# Altium PCB PCB1.PcbDoc (part 2 of 2)
Units mm, origin at the board's own origin, x right, y up, seen from the top; angles counter-clockwise.
Board outline 60 x 60 mm, 2 copper layers (Top Layer, Bottom Layer); 59 components, 49 nets, 265 pads, 0 vias.
Unrouted connection lines stored in the file: 170.
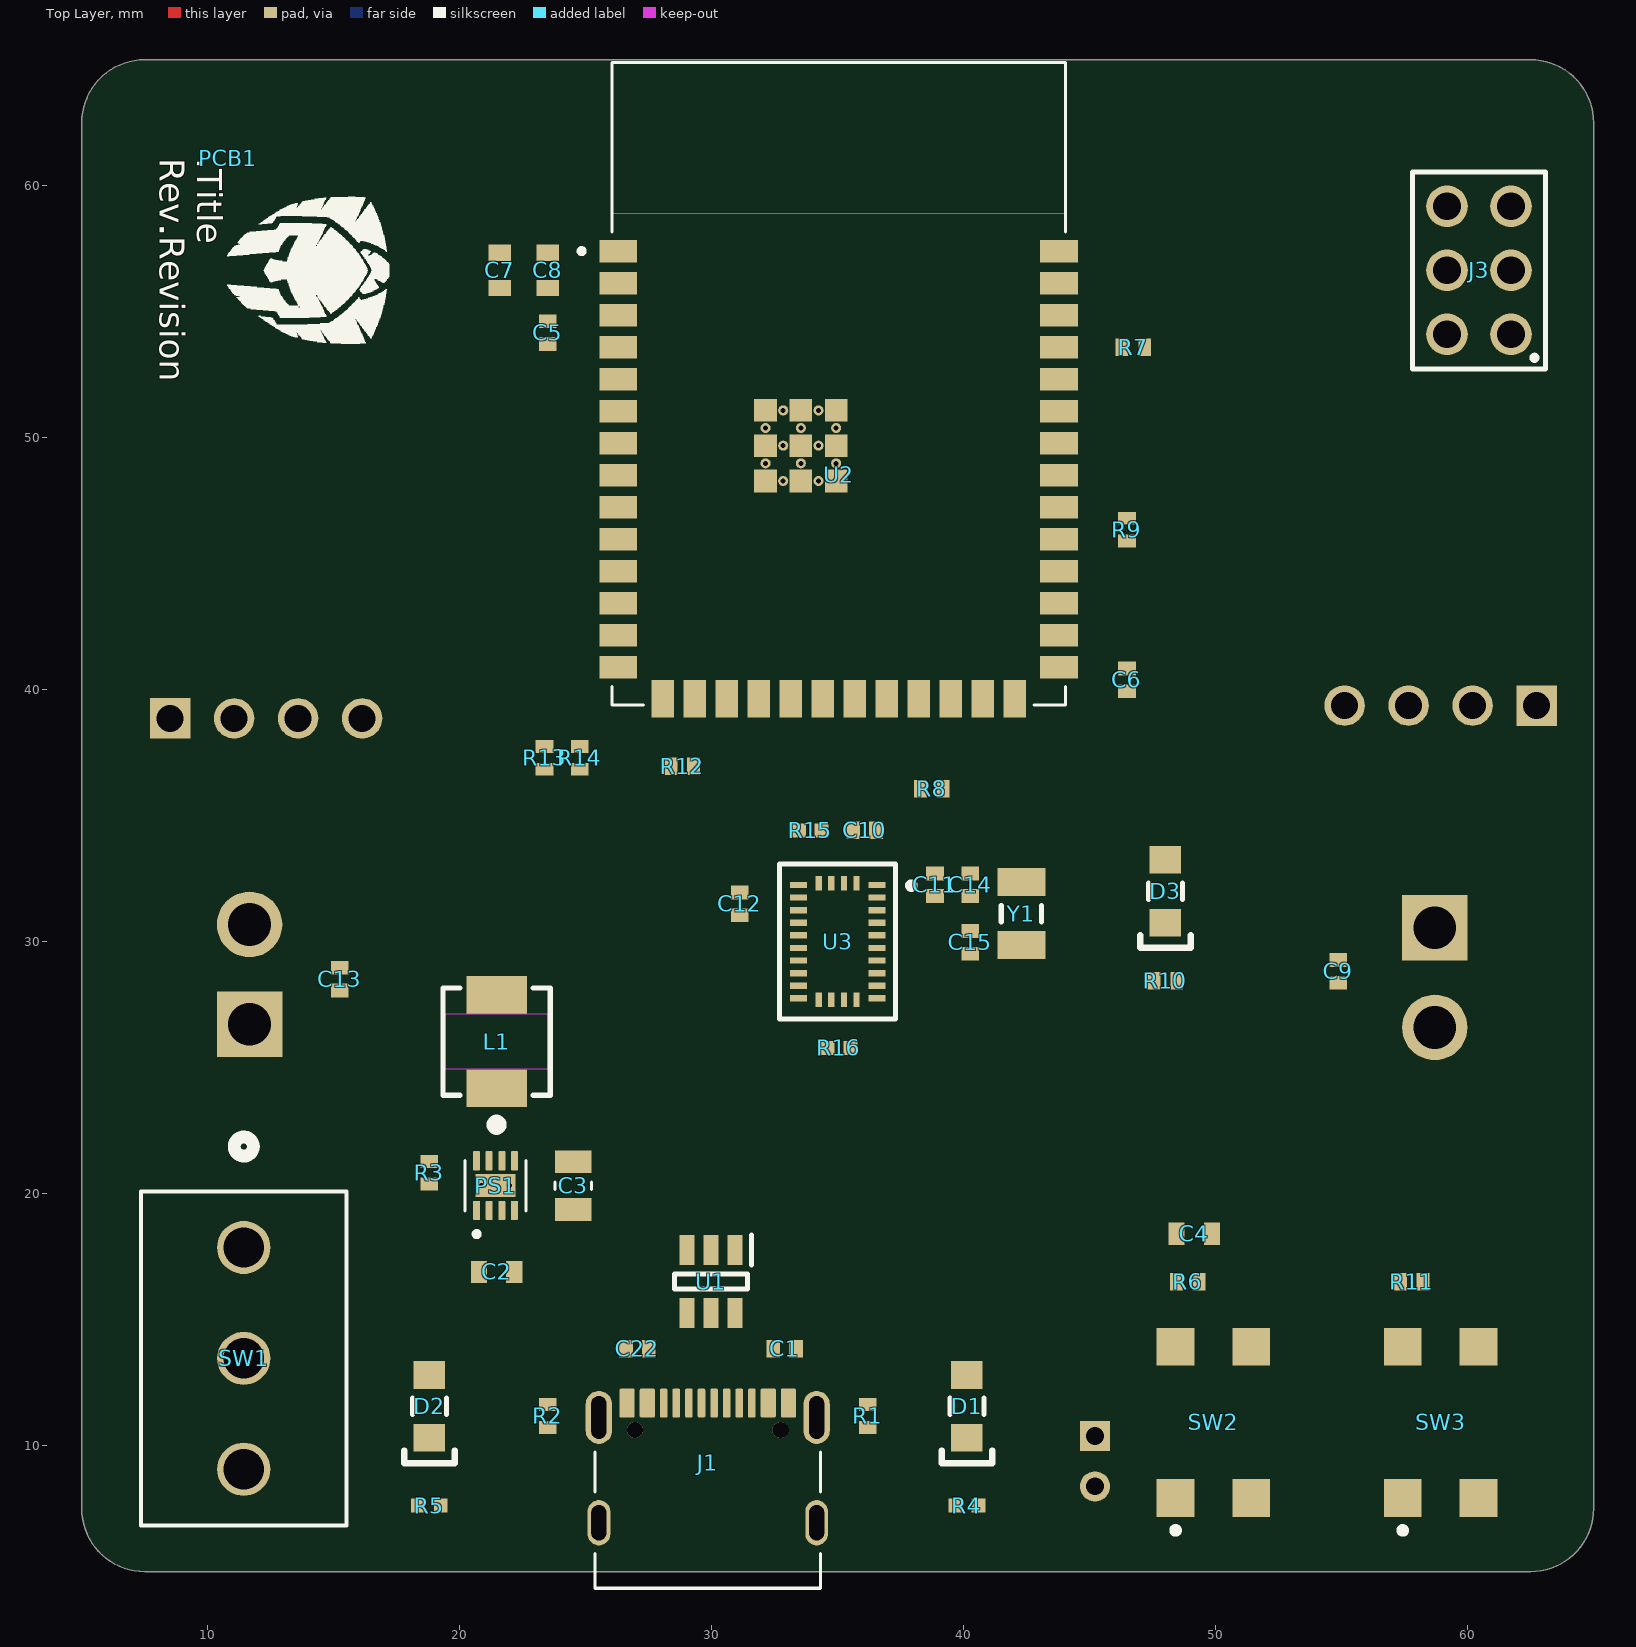
[diagram p0: Top Layer view]

## Part data (continued)
R1 R2: library part "R5K1 1% 0402", "5K1 1% 0402 1/16W", Manufacturer="Stackpole Electronics Inc", Manufacturer Part Number=RMCF0402FT5K10, Package=0402, Power=1/16W, Supplier Part Number 1=RMCF0402FT5K10CT-ND, Tolerance=1%, Datasheet=https://www.seielect.com/catalog/sei-rmcf_rmcp.pdf, Internal Code=0-ECRES5K1%01P0402-SI, Supplier 1=DigiKey, Supplier Link 1=https://www.digikey.com/product-detail/en/stackpole-electronics-inc/RMCF0402FT5K10/RMCF0402FT5K10CT-ND/2417741, Type=Resistor
R3: library part "R100K 1% 0402", "100K 1% 0402 1/16W", Manufacturer=Yageo, Package=0402, Power=1/16W, Supplier Part Number 1=311-100KLRCT-ND, Tolerance=1%, Manufacturer Part Number=RC0402FR-07100KL, Supplier 1=Digikey, Supplier Link 1=https://www.digikey.com/product-detail/en/yageo/RC0402FR-07100KL/311-100KLRCT-ND/729473, Type=Resistor
R4 R5 R15 R16: library part "R10K 1% 0402", "Res Thick Film 0402 10K Ohm 1% 0.063W(1/16W) ±100ppm/C Pad SMD T/R", Case Code (Imperial)=0402, Manufacturer="Yageo Group", Max Operating Temperature=155°C, Min Operating Temperature=-55°C, Power Dissipation=62.5mW, Power Rating=63mW, Supplier Part Number=311-10.0KLRDKR-ND, Temperature Coefficient=100ppm/°C, Tolerance=1%, Voltage Rating=50V, Case Code (Metric)=0402, Case/Package=0402, Category="Chip SMD Resistors", China RoHS=Non-Compliant, ComponentLink1Description=https://datasheet.octopart.com:443/RC0402FR-0710KL-Yageo-datasheet-175887523.pdf?src-supplier=Newark, ComponentLink1URL=https://datasheet.octopart.com:443/RC0402FR-0710KL-Yageo-datasheet-175887523.pdf?src-supplier=Newark, ComponentLink2Description=https://datasheet.octopart.com:443/RC0402FR-0710KL-Yageo-Group-datasheet-190305687.pdf?src-supplier=Newark, ComponentLink2URL=https://datasheet.octopart.com:443/RC0402FR-0710KL-Yageo-Group-datasheet-190305687.pdf?src-supplier=Newark, ComponentLink3Description=https://datasheet.octopart.com:443/RC0402FR-0710KL-Yageo-datasheet-12531192.pdf?src-supplier=Newark, ComponentLink3URL=https://datasheet.octopart.com:443/RC0402FR-0710KL-Yageo-datasheet-12531192.pdf?src-supplier=Newark, ComponentLink4Description=https://datasheet.octopart.com:443/RC0402FR-0710KL-Yageo-datasheet-8324527.pdf?src-supplier=Newark, ComponentLink4URL=https://datasheet.octopart.com:443/RC0402FR-0710KL-Yageo-datasheet-8324527.pdf?src-supplier=Newark, ComponentLink5Description=https://datasheet.octopart.com:443/RC0402FR-0710KL-Yageo-datasheet-10408619.pdf?src-supplier=element14+APAC, ComponentLink5URL=https://datasheet.octopart.com:443/RC0402FR-0710KL-Yageo-datasheet-10408619.pdf?src-supplier=element14+APAC, ComponentLink6Description=https://datasheet.octopart.com:443/RC0402FR-0710KL-Yageo-datasheet-62067350.pdf?src-supplier=element14+APAC, ComponentLink6URL=https://datasheet.octopart.com:443/RC0402FR-0710KL-Yageo-datasheet-62067350.pdf?src-supplier=element14+APAC, ComponentLink7Description=https://datasheet.octopart.com:443/RC0402FR-0710KL-Yageo-datasheet-21426659.pdf?src-supplier=element14+APAC, ComponentLink7URL=https://datasheet.octopart.com:443/RC0402FR-0710KL-Yageo-datasheet-21426659.pdf?src-supplier=element14+APAC, ComponentLink8Description=https://datasheet.octopart.com:443/RC0402FR-0710KL-Yageo-datasheet-164759695.pdf?src-supplier=Upverter, ComponentLink8URL=https://datasheet.octopart.com:443/RC0402FR-0710KL-Yageo-datasheet-164759695.pdf?src-supplier=Upverter, ComponentLink9Description=https://datasheet.octopart.com:443/RC0402FR-0710KL-Yageo-datasheet-103092701.pdf?src-supplier=Upverter, ComponentLink9URL=https://datasheet.octopart.com:443/RC0402FR-0710KL-Yageo-datasheet-103092701.pdf?src-supplier=Upverter, ComponentLink10Description=https://sigma.octopart.com:443/138820526/technical_drawing/Yageo-RC0402FR-0710KL.pdf?src-supplier=Upverter, ComponentLink10URL=https://sigma.octopart.com:443/138820526/technical_drawing/Yageo-RC0402FR-0710KL.pdf?src-supplier=Upverter, ComponentLink11Description=https://datasheet.octopart.com:443/RC0402FR-0710KL-Yageo-datasheet-98239111.pdf?src-supplier=Upverter, ComponentLink11URL=https://datasheet.octopart.com:443/RC0402FR-0710KL-Yageo-datasheet-98239111.pdf?src-supplier=Upverter, ComponentLink12Description=https://datasheet.octopart.com:443/RC0402FR-0710KL-Yageo-datasheet-68298067.pdf?src-supplier=Upverter, ComponentLink12URL=https://datasheet.octopart.com:443/RC0402FR-0710KL-Yageo-datasheet-68298067.pdf?src-supplier=Upverter, ComponentLink13Description=https://datasheet.octopart.com:443/RC0402FR-0710KL-Yageo-datasheet-68297981.pdf?src-supplier=Upverter, ComponentLink13URL=https://datasheet.octopart.com:443/RC0402FR-0710KL-Yageo-datasheet-68297981.pdf?src-supplier=Upverter, ComponentLink14Description=https://datasheet.octopart.com:443/RC0402FR-0710KL-Yageo-datasheet-141435361.pdf?src-supplier=Upverter, ComponentLink14URL=https://datasheet.octopart.com:443/RC0402FR-0710KL-Yageo-datasheet-141435361.pdf?src-supplier=Upverter, ComponentLink15Description=https://datasheet.octopart.com:443/RC0402FR-0710KL-Yageo-datasheet-12509768.pdf?src-supplier=Upverter, ComponentLink15URL=https://datasheet.octopart.com:443/RC0402FR-0710KL-Yageo-datasheet-12509768.pdf?src-supplier=Upverter, ComponentLink16Description=https://datasheet.octopart.com:443/RC0402FR-0710KL-Yageo-datasheet-8329306.pdf?src-supplier=element14, ComponentLink16URL=https://datasheet.octopart.com:443/RC0402FR-0710KL-Yageo-datasheet-8329306.pdf?src-supplier=element14, ComponentLink17Description=https://datasheet.octopart.com:443/RC0402FR-0710KL-Yageo-datasheet-505231.pdf?src-supplier=element14, ComponentLink17URL=https://datasheet.octopart.com:443/RC0402FR-0710KL-Yageo-datasheet-505231.pdf?src-supplier=element14, ComponentLink18Description=https://datasheet.octopart.com:443/RC0402FR-0710KL-Yageo-datasheet-175423674.pdf?src-supplier=SOS+electronic, ComponentLink18URL=https://datasheet.octopart.com:443/RC0402FR-0710KL-Yageo-datasheet-175423674.pdf?src-supplier=SOS+electronic, ComponentLink19Description=https://datasheet.octopart.com:443/RC0402FR-0710KL-Yageo-datasheet-137700087.pdf?src-supplier=Future+Electronics, ComponentLink19URL=https://datasheet.octopart.com:443/RC0402FR-0710KL-Yageo-datasheet-137700087.pdf?src-supplier=Future+Electronics, ComponentLink20Description=https://datasheet.octopart.com:443/RC0402FR-0710KL-Yageo-datasheet-8324255.pdf?src-supplier=Future+Electronics, ComponentLink20URL=https://datasheet.octopart.com:443/RC0402FR-0710KL-Yageo-datasheet-8324255.pdf?src-supplier=Future+Electronics, ComponentLink21Description=https://datasheet.octopart.com:443/RC0402FR-0710KL-Yageo-datasheet-79472498.pdf?src-supplier=Megastar, ComponentLink21URL=https://datasheet.octopart.com:443/RC0402FR-0710KL-Yageo-datasheet-79472498.pdf?src-supplier=Megastar, ComponentLink22Description=https://datasheet.octopart.com/RC0402FR-0710KL-Yageo-datasheet-73766026.pdf, ComponentLink22URL=https://datasheet.octopart.com/RC0402FR-0710KL-Yageo-datasheet-73766026.pdf, ComponentLink23Description=http://sigma.octopart.com:80/conflict_mineral_statement/Yageo-company-3.pdf?src-supplier=Compliance+Statements, ComponentLink23URL=http://sigma.octopart.com:80/conflict_mineral_statement/Yageo-company-3.pdf?src-supplier=Compliance+Statements, ComponentLink24Description=http://sigma.octopart.com:80/rohs_statement/Yageo-company-2.pdf?src-supplier=Compliance+Statements, ComponentLink24URL=http://sigma.octopart.com:80/rohs_statement/Yageo-company-2.pdf?src-supplier=Compliance+Statements, Composition="Thick Film", Depth=500µm, Height=350µm, Lead Free="Lead Free", Lead Pitch=200µm, Length=1mm, Lifecycle Status=Production, Manufacturer Part Number=RC0402FR-0710KL, Military Standard=Not, Mounting Technology="Surface Mount", Number of Terminals=2, Number of Terminations=2, Packaging="Tape & Reel", Pins=2, Pricing="1=0.1, 10=0.010, 25=0.0072, 50=0.004 (USD)", REACH SVHC=Yes, RoHS=Compliant, Schedule B="8533210045, 8533210045|8533210045|8533210045|8533210045|8533210045|8533210045|8533210045|8533210045|8533210045|8533210045|8533210045|8533210045|8533210045|8533210045, 8533210045|8533210045|8533210045|8533210045|8533210045|8533210045|8533210045|8533210045|8533210045|8533210045|8533210045|8533210045|8533210045|8533210045|8533210045, 8533210045|8533210045|8533210045|8533210045|8533210045|8533210045|8533210045|8533210045|8533210045|8533210045|8533210045|8533210045|8533210045|8533210045|8533210045|8533210045", Stock=4103358, Supplier=DigiKey, Supplier 1=DigiKey, Supplier 2=DigiKey, Supplier 3=Mouser, Supplier Part Number 1=311-10.0KLRDKR-ND, Supplier Part Number 2=311-10.0KLRCT-ND, Supplier Part Number 3=603-RC0402FR-0710KL, Termination=SMD/SMT, Voltage Rating (DC)=50V, Width=500µm, Working Voltage=50V
R6 R10: library part "R10K 1% 0402", "10K 1% 0402 1/16W", Manufacturer=Yageo, Package=0402, Power=1/16W, Supplier Part Number 1=311-10.0KLRCT-ND, Tolerance=1%, Datasheet=http://www.yageo.com/documents/recent/PYu-RC_Group_51_RoHS_L_10.pdf, Internal Code=0-ECRES10K%01P0402-YG, Manufacturer Part Number=RC0402FR-0710KL, Supplier 1=DigiKey, Supplier Link 1=https://www.digikey.com/product-detail/en/yageo/RC0402FR-0710KL/311-10.0KLRCT-ND/729470, Type=Resistor
R7: library part "R470 1% 0402", "470R 1% 0402 1/16W", Case/Package=0402, Manufacturer=Yageo, Manufacturer Part Number=RC0402FR-07470RL, Max Operating Temperature=155°C, Min Operating Temperature=-55°C, Package Height=0.35mm, Package Length=1mm, Package Shape=Rectangular, Package Width=0.5mm, Power=62.5mW, Rated Temperature=70°C, Resistor Type="FIXED RESISTOR", Supplier Part Number=311-470LRCT-ND, Temperature Coefficient (ppm/Cel)=100, Tolerance=1%, Working Voltage=50V, Additional Feature="LASER TRIMMABLE", Category="Chip SMD Resistors", ComponentLink1Description=https://datasheet.ciiva.com:443/pdfs/VipMasterIC/IC/YAGO/YAGO-S-A0008145938/YAGO-S-A0008145938-1.pdf?src-supplier=IHS+Markit, ComponentLink1URL=https://datasheet.ciiva.com:443/pdfs/VipMasterIC/IC/YAGO/YAGO-S-A0008145938/YAGO-S-A0008145938-1.pdf?src-supplier=IHS+Markit, ComponentLink2Description=https://datasheet.ciiva.com/2453/pyu-r-int-thick-7-2453376.pdf?src-supplier=Digikey, ComponentLink2URL=https://datasheet.ciiva.com/2453/pyu-r-int-thick-7-2453376.pdf?src-supplier=Digikey, ComponentLink3Description=https://datasheet.ciiva.com/2453/pyu-r-int-thick-7-2453377.pdf?src-supplier=Digikey, ComponentLink3URL=https://datasheet.ciiva.com/2453/pyu-r-int-thick-7-2453377.pdf?src-supplier=Digikey, ComponentLink4Description=https://datasheet.ciiva.com/2453/pyu-r-int-thick-7-2453378.pdf?src-supplier=Digikey, ComponentLink4URL=https://datasheet.ciiva.com/2453/pyu-r-int-thick-7-2453378.pdf?src-supplier=Digikey, ComponentLink5Description=https://datasheet.ciiva.com/15189/getdatasheetpartid-330246-15189463.pdf?src-supplier=Verical, ComponentLink5URL=https://datasheet.ciiva.com/15189/getdatasheetpartid-330246-15189463.pdf?src-supplier=Verical, ComponentLink6Description=https://datasheet.ciiva.com/7850/1018594-7850014.pdf?src-supplier=Element14, ComponentLink6URL=https://datasheet.ciiva.com/7850/1018594-7850014.pdf?src-supplier=Element14, ComponentLink7Description=https://datasheet.ciiva.com/7850/1018594-7850015.pdf?src-supplier=Element14, ComponentLink7URL=https://datasheet.ciiva.com/7850/1018594-7850015.pdf?src-supplier=Element14, ComponentLink8Description=https://datasheet.ciiva.com/46412/1018594-46412838.pdf?src-supplier=Element14, ComponentLink8URL=https://datasheet.ciiva.com/46412/1018594-46412838.pdf?src-supplier=Element14, Construction=Chip, JESD-609 Code=e3, Mounting Technology="Surface Mount", Packaging="Tape and Reel", Pins=2, Pricing="1=0.1, 10=0.008, 25=0.004, 50=0.003 (USD)", Reach SVHC Compliant=Yes, RoHS=Yes, RoHS Compliant=Yes, Stock=1075453, Supplier=Digikey, Technology="METAL GLAZE/THICK FILM", Terminal Finish=Nickel, Termination=Wraparound
R8 R9: library part "R2K2 1% 0402", "2K2 1% 0402 1/16W", Manufacturer=Yageo, Package=0402, Power=1/16W, Supplier Part Number 1=YAG1260CT-ND, Tolerance=1%, Datasheet=https://www.yageo.com/upload/media/product/productsearch/datasheet/rchip/PYu-RC_51_RoHS_P_1.pdf, Manufacturer Part Number=RC0402FR-072K2P, Supplier 1=DigiKey, Supplier Link 1=https://www.digikey.fr/product-detail/en/yageo/RC0402FR-072K2P/YAG1260CT-ND/4935375, Type=Resistor
R11 R12: library part "R47K 1% 0402", "47K 1% 0402 1/16W", Manufacturer=Yageo, Package=0402, Power=1/16W, Supplier Part Number 1=603-RC0402FR-7D47KL, Tolerance=1%, Manufacturer Part Number=RC0402FR-7D47KL, Supplier 1=Mouser, Type=Resistor
R13 R14: library part "R33 1% 0402", "Res Thick Film 0402 33 Ohm 5% 0.063W(1/16W) ±100ppm/C Pad SMD T/R", Case Code (Imperial)=0402, Manufacturer="Yageo Group", Max Operating Temperature=155°C, Max Power Dissipation=63mW, Min Operating Temperature=-55°C, Power Rating=62.5mW, Supplier Part Number=311-33JRDKR-ND, Temperature Coefficient=100ppm/°C, Tolerance=5%, Voltage Rating=50V, Case/Package=0402, Category="Chip SMD Resistors", China RoHS=Non-Compliant, ComponentLink1Description=https://datasheet.octopart.com:443/RC0402JR-0733RL-Yageo-datasheet-175887523.pdf?src-supplier=Newark, ComponentLink1URL=https://datasheet.octopart.com:443/RC0402JR-0733RL-Yageo-datasheet-175887523.pdf?src-supplier=Newark, ComponentLink2Description=https://datasheet.octopart.com:443/RC0402JR-0733RL-Yageo-datasheet-10408619.pdf?src-supplier=Newark, ComponentLink2URL=https://datasheet.octopart.com:443/RC0402JR-0733RL-Yageo-datasheet-10408619.pdf?src-supplier=Newark, ComponentLink3Description=https://datasheet.octopart.com:443/RC0402JR-0733RL-Yageo-datasheet-8324527.pdf?src-supplier=Newark, ComponentLink3URL=https://datasheet.octopart.com:443/RC0402JR-0733RL-Yageo-datasheet-8324527.pdf?src-supplier=Newark, ComponentLink4Description=https://datasheet.octopart.com:443/RC0402JR-0733RL-Yageo-datasheet-141265859.pdf?src-supplier=Upverter, ComponentLink4URL=https://datasheet.octopart.com:443/RC0402JR-0733RL-Yageo-datasheet-141265859.pdf?src-supplier=Upverter, ComponentLink5Description=https://sigma.octopart.com:443/138820526/technical_drawing/Yageo-RC0402JR-0733RL.pdf?src-supplier=Upverter, ComponentLink5URL=https://sigma.octopart.com:443/138820526/technical_drawing/Yageo-RC0402JR-0733RL.pdf?src-supplier=Upverter, ComponentLink6Description=https://datasheet.octopart.com:443/RC0402JR-0733RL-Yageo-datasheet-62067350.pdf?src-supplier=element14+APAC, ComponentLink6URL=https://datasheet.octopart.com:443/RC0402JR-0733RL-Yageo-datasheet-62067350.pdf?src-supplier=element14+APAC, ComponentLink7Description=https://datasheet.octopart.com:443/RC0402JR-0733RL-Yageo-Group-datasheet-176638170.pdf?src-supplier=Future+Electronics, ComponentLink7URL=https://datasheet.octopart.com:443/RC0402JR-0733RL-Yageo-Group-datasheet-176638170.pdf?src-supplier=Future+Electronics, ComponentLink8Description=https://datasheet.octopart.com:443/RC0402JR-0733RL-Yageo-datasheet-164759695.pdf?src-supplier=Future+Electronics, ComponentLink8URL=https://datasheet.octopart.com:443/RC0402JR-0733RL-Yageo-datasheet-164759695.pdf?src-supplier=Future+Electronics, ComponentLink9Description=https://datasheet.octopart.com:443/RC0402JR-0733RL-Yageo-datasheet-127823281.pdf?src-supplier=Future+Electronics, ComponentLink9URL=https://datasheet.octopart.com:443/RC0402JR-0733RL-Yageo-datasheet-127823281.pdf?src-supplier=Future+Electronics, ComponentLink10Description=https://datasheet.octopart.com:443/RC0402JR-0733RL-Yageo-datasheet-137700087.pdf?src-supplier=Future+Electronics, ComponentLink10URL=https://datasheet.octopart.com:443/RC0402JR-0733RL-Yageo-datasheet-137700087.pdf?src-supplier=Future+Electronics, ComponentLink11Description=https://datasheet.octopart.com:443/RC0402JR-0733RL-Yageo-datasheet-103092701.pdf?src-supplier=Future+Electronics, ComponentLink11URL=https://datasheet.octopart.com:443/RC0402JR-0733RL-Yageo-datasheet-103092701.pdf?src-supplier=Future+Electronics, ComponentLink12Description=https://datasheet.octopart.com:443/RC0402JR-0733RL-Yageo-datasheet-98239111.pdf?src-supplier=Future+Electronics, ComponentLink12URL=https://datasheet.octopart.com:443/RC0402JR-0733RL-Yageo-datasheet-98239111.pdf?src-supplier=Future+Electronics, ComponentLink13Description=https://datasheet.octopart.com:443/RC0402JR-0733RL-Yageo-datasheet-77992522.pdf?src-supplier=Future+Electronics, ComponentLink13URL=https://datasheet.octopart.com:443/RC0402JR-0733RL-Yageo-datasheet-77992522.pdf?src-supplier=Future+Electronics, ComponentLink14Description=https://datasheet.octopart.com:443/RC0402JR-0733RL-Yageo-datasheet-67302840.pdf?src-supplier=Future+Electronics, ComponentLink14URL=https://datasheet.octopart.com:443/RC0402JR-0733RL-Yageo-datasheet-67302840.pdf?src-supplier=Future+Electronics, ComponentLink15Description=https://datasheet.octopart.com:443/RC0402JR-0733RL-Yageo-datasheet-12531192.pdf?src-supplier=Future+Electronics, ComponentLink15URL=https://datasheet.octopart.com:443/RC0402JR-0733RL-Yageo-datasheet-12531192.pdf?src-supplier=Future+Electronics, ComponentLink16Description=https://datasheet.octopart.com:443/RC0402JR-0733RL-Yageo-datasheet-505231.pdf?src-supplier=Future+Electronics, ComponentLink16URL=https://datasheet.octopart.com:443/RC0402JR-0733RL-Yageo-datasheet-505231.pdf?src-supplier=Future+Electronics, ComponentLink17Description=https://datasheet.octopart.com/RC0402JR-0733RL-Yageo-datasheet-73766026.pdf, ComponentLink17URL=https://datasheet.octopart.com/RC0402JR-0733RL-Yageo-datasheet-73766026.pdf, ComponentLink18Description=https://datasheet.octopart.com:443/RC0402JR-0733RL-Yageo-datasheet-8329306.pdf?src-supplier=element14, ComponentLink18URL=https://datasheet.octopart.com:443/RC0402JR-0733RL-Yageo-datasheet-8329306.pdf?src-supplier=element14, ComponentLink19Description=http://sigma.octopart.com:80/conflict_mineral_statement/Yageo-company-3.pdf?src-supplier=Compliance+Statements, ComponentLink19URL=http://sigma.octopart.com:80/conflict_mineral_statement/Yageo-company-3.pdf?src-supplier=Compliance+Statements, ComponentLink20Description=http://sigma.octopart.com:80/rohs_statement/Yageo-company-2.pdf?src-supplier=Compliance+Statements, ComponentLink20URL=http://sigma.octopart.com:80/rohs_statement/Yageo-company-2.pdf?src-supplier=Compliance+Statements, Composition="Thick Film", Country of Origin="Mainland China, Taiwan", Depth=500µm, Export Control Classification Number (ECCN) Code=EAR99, Features="Moisture Resistant", Harmonized Tariff Schedule (HTS) Code=8533.21.00.30, Height=350µm, Introduction Date=2008-07-18, Lead Free="Lead Free", Length=1mm, Lifecycle Status=Production, Manufacturer Part Number=RC0402JR-0733RL, Military Standard=Not, Mounting Technology="Surface Mount", Number of Terminals=2, Number of Terminations=2, Packaging="Cut Tape", Pins=2, Pricing="1=0,1, 10=0,019, 25=0,0136, 50=0,0108, 100=0,0087, 250=0,0066, 500=0,00542, 1000=0,00451, 5000=0,00309 (USD)", REACH SVHC=Yes, RoHS=Compliant, Schedule B="8533210045, 8533210045|8533210045, 8533210045|8533210045|8533210045, 8533210045|8533210045|8533210045|8533210045", Stock=4800627, Supplier=DigiKey, Supplier 1=DigiKey, Supplier 2=DigiKey, Supplier Part Number 1=311-33JRDKR-ND, Supplier Part Number 2=311-33JRCT-ND, Termination=SMD/SMT, Voltage Rating (AC)=50V, Voltage Rating (DC)=50V, Width=500µm, Working Voltage=50V
SW1: "Switch Slide ON ON SPDT Top Slide 6A 250VAC 30VDC 100000Cycles PC Pins Thru-Hole Bag", Contact Current Rating=6A, Current Rating=4A, Manufacturer="Nidec Copal", Manufacturer_Name="Nidec Copal Electronics", Max Operating Temperature=85°C, Min Operating Temperature=-30°C, Voltage Rating (AC)=125V, Voltage Rating (DC)=30V, Actuator Length=5mm, Category="Slide Switches", ComponentLink1Description=https://datasheet.octopart.com:443/8SS1012-Z-Nidec-Copal-datasheet-180925849.pdf?src-supplier=IHS, ComponentLink1URL=https://datasheet.octopart.com:443/8SS1012-Z-Nidec-Copal-datasheet-180925849.pdf?src-supplier=IHS, ComponentLink2Description=https://datasheet.octopart.com:443/8SS1012-Z-Nidec-datasheet-158724552.pdf?src-supplier=RS+(Formerly+Allied+Electronics), ComponentLink2URL=https://datasheet.octopart.com:443/8SS1012-Z-Nidec-datasheet-158724552.pdf?src-supplier=RS+(Formerly+Allied+Electronics), Contact Plating=Silver, Contact Style=Non-Shorting, Copyright="Copyright (C) 2025 Ultra Librarian. All rights reserved.", Electrical Life=30kcycles, Export Control Classification Number (ECCN) Code=EAR99, Harmonized Tariff Schedule (HTS) Code=8536.50.70.00, Introduction Date=2016-11-16, Lifecycle Status=Production, Manufacturer Part Number=8SS1012-Z, Manufacturer_Part_Number=8SS1012-Z, Mechanical Life=100kcycles, Mounting Technology="Through Hole", Orientation=Vertical, Pricing="2=1,567 (USD)", RefDes=RefDes, RoHS=Compliant, Stock=1202, Supplier="Arrow Electronics", Supplier Part Number=8SS1012-Z, Switch Function=On-On, Switch Travel=2.2mm, Termination="PC Pin", Throw Configuration=SPDT, Type="Slide Switches"
SW2 SW3: "Tactile Switch SPST 1.6N 4.5mm", Manufacturer 1=HanElectricity, Manufacturer Part Number 1=C22375350, Supplier 1=LCSC, Supplier Link 1=https://www.lcsc.com/product-detail/C22375350.html?spm=wm.fly.bg.5.xh&lcsc_vid=FlhaAlQAEVMNVwEHT1BfXwFWEwcLXgcEEldWBVUDFFcxVlNRQlBYUFNUR1VWUjsOAxUeFF5JWBYZEEoBGA4JCwFIFA4DSA%3D%3D, Supplier Part Number 1=C22375350, Supplier Unit Price 1=0.0056
U1: "TVS Diode Array Uni-Directional USBLC6-2SC6 17V", Manufacturer 1=STMicroelectronics, Supplier Part Number 1=511-USBLC6-2SC6, Datasheet=https://www.st.com/resource/en/datasheet/usblc6-2.pdf, Height=1.45mm, Manufacturer Part Number 1=USBLC6-2SC6, Supplier 1=Mouser, Supplier Link 1=https://br.mouser.com/ProductDetail/STMicroelectronics/USBLC6-2SC6?qs=po45yt2pPpu%2FhNIlwQdTlg%3D%3D&srsltid=AfmBOoqislOEDh1UBDOoi8KtJgWNZBCyfvAKcoWTZlt-wyjpMBhjDG33, Supplier Unit Price 1=0.36
U2: Package=None, Availability=Unavailable, MF="{'manufacturer': u'Espressif Systems'}", MP=ESP32-S3-WROOM-1-N4, Price=None
U3: "IMU ACCEL/GYRO/MAG I2C 32BIT", Manufacturer="Hillcrest Laboratories, Inc.", Max Supply Voltage=3.6V, Min Supply Voltage=1.7V, Temperature="-40°C to +85°C", Temperature Range High=+85°C, Temperature Range Low=-40°C, Accel Range=8g, Automotive=No, Category=IC, ComponentLink2Description=Datasheet, ComponentLink2URL=https://www.hillcrestlabs.com/download/5a747b8d566d073a5d000536, Device Class L1=Sensors, Device Class L2="Motion Sensors", Device Class L3="Inertial Measurement Units (IMUs)", Digikey Description="IMU ACCEL/GYRO/MAG I2C 32BIT", Height=1.18mm, Lead Free=Yes, Manufacturer Part Number=BNO085, Octopart=https://octopart.com/bno085-hillcrest+laboratories-92813482, Package=BNO085, RoHS=TRUE, Sensor Output=I2C,SPI,UART, Sensor Type=Accelerometer,Gyroscope,Magnetometer
U4: "Driver IC for Dual DC Motor, 15 V, -20 to 85 degC, 24-Pin SSOP, RoHS, Tape and Reel", Case/Package=LSSOP, Manufacturer=Toshiba, Manufacturer Package Identifier=SSOP24-P-300-0.65A, Manufacturer Part Number=TB6612FNG(O,C,8,EL, Max Operating Temperature=85°C, Max Output current=1A, Max Power Dissipation=1.36W, Max Supply Current=2.2mA, Max Supply Voltage=5.5V, Min Operating Temperature=-20°C, Min Supply Voltage=2.7V, Nominal Supply Voltage (DC)=3V, Output Voltage=15V, Supplier Part Number 1=TB6612FNGC8ELDKR-ND, Switching Frequency=100kHz, Category="Motor Drivers", ComponentLink1Description=https://datasheet.octopart.com:443/TB6612FNG%28O%2CC%2C8%2CEL-Toshiba-datasheet-137045272.pdf?src-supplier=IHS, ComponentLink1URL=https://datasheet.octopart.com:443/TB6612FNG%28O%2CC%2C8%2CEL-Toshiba-datasheet-137045272.pdf?src-supplier=IHS, ComponentLink2Description=https://datasheet.octopart.com:443/TB6612FNG%28O%2CC8%2CEL%29-Toshiba-datasheet-141427499.pdf?src-supplier=Upverter, ComponentLink2URL=https://datasheet.octopart.com:443/TB6612FNG%28O%2CC8%2CEL%29-Toshiba-datasheet-141427499.pdf?src-supplier=Upverter, ComponentLink3Description=https://datasheet.octopart.com/TB6612FNG%2CC%2C8%2CEL-Toshiba-datasheet-32979960.pdf, ComponentLink3URL=https://datasheet.octopart.com/TB6612FNG%2CC%2C8%2CEL-Toshiba-datasheet-32979960.pdf, ComponentLink4Description=https://datasheet.octopart.com/TB6612FNG%28O%2CC%2C8%2CEL-Toshiba-datasheet-13326806.pdf, ComponentLink4URL=https://datasheet.octopart.com/TB6612FNG%28O%2CC%2C8%2CEL-Toshiba-datasheet-13326806.pdf, Export Control Classification Number (ECCN) Code=EAR99, Harmonized Tariff Schedule (HTS) Code=8542.39.00.60, Height=1.6mm, Height - Seated (Max)=1.6mm, Interface=Parallel, Introduction Date=2014-12-16, Length=7.8mm, Lifecycle Status=Production, Logic Function=AND, Motor Type=Brushed, Mounting Technology="Surface Mount", Number of Channels=2, Number of Circuits=2, Number of Outputs=2, Number of Terminals=24, Output Current=1A, Packaging="Cut Tape (CT)", Pins=24, Pricing="1=2,72, 10=2,39, 25=2,16, 50=1,93, 100=1,69, 250=1,45, 500=1,31, 1000=1,25 (USD)", REACH SVHC=Yes, RoHS=Compliant, Schedule B="8542390000, 8542390000|8542390000|8542390000|8542390000|8542390000|8542390000|8542390000|8542390000|8542390000|8542390000|8542390000|8542390000|8542390000|8542390000|8542390000|8542390000|8542390000|8542390000|8542390000|8542390000|8542390000|8542390000|8542390000|85", Stock=1202, Supplier=Newark, Supplier 1=DigiKey, Supplier 2=DigiKey, Supplier 3=Mouser, Supplier Part Number=TB6612FNG(O,C,8,EL, Supplier Part Number 2=TB6612FNGC8ELCT-ND, Supplier Part Number 3=757-TB6612FNGC8EL, Terminal Pitch=650µm, Width=5.6mm
Y1: library part "Crystal 32.768 Mhz", "Crystal 0.032768MHz ±20ppm (Tol) 12.5pF Flexural 70000Ohm 2-Pin CSMD T/R", Case/Package=CSMD, ESR (Equivalent Series Resistance)=70kR, Frequency=32.768kHz, Frequency Stability=144ppm, Frequency Tolerance=20ppm, Load Capacitance=12.5pF, Manufacturer=Abracon, Max Operating Temperature=85°C, Min Operating Temperature=-40°C, Operating Frequency="32.768 kHz", Package Quantity=3000, Supplier Part Number 1=535-9542-6-ND, Category=Crystals, China RoHS=Compliant, ComponentLink1Description=https://datasheet.octopart.com:443/ABS07-32.768KHZ-T-Abracon-datasheet-166693031.pdf?src-supplier=JRH+Electronics, ComponentLink1URL=https://datasheet.octopart.com:443/ABS07-32.768KHZ-T-Abracon-datasheet-166693031.pdf?src-supplier=JRH+Electronics, ComponentLink2Description=https://datasheet.octopart.com:443/ABS07-32.768KHZ-T-Abracon-datasheet-103422647.pdf?src-supplier=JRH+Electronics, ComponentLink2URL=https://datasheet.octopart.com:443/ABS07-32.768KHZ-T-Abracon-datasheet-103422647.pdf?src-supplier=JRH+Electronics, ComponentLink3Description=https://datasheet.octopart.com:443/ABS07-32.768KHZ-T-Abracon-datasheet-12512028.pdf?src-supplier=Upverter, ComponentLink3URL=https://datasheet.octopart.com:443/ABS07-32.768KHZ-T-Abracon-datasheet-12512028.pdf?src-supplier=Upverter, ComponentLink4Description=https://datasheet.octopart.com:443/ABS07-32.768KHZ-T-Abracon-datasheet-10031075.pdf?src-supplier=Upverter, ComponentLink4URL=https://datasheet.octopart.com:443/ABS07-32.768KHZ-T-Abracon-datasheet-10031075.pdf?src-supplier=Upverter, ComponentLink5Description=https://datasheet.octopart.com:443/ABS07-32.768KHZ-T-Abracon-datasheet-8326266.pdf?src-supplier=Upverter, ComponentLink5URL=https://datasheet.octopart.com:443/ABS07-32.768KHZ-T-Abracon-datasheet-8326266.pdf?src-supplier=Upverter, ComponentLink6Description=https://datasheet.octopart.com:443/ABS07-32.768KHZ-T-Abracon-datasheet-121082.pdf?src-supplier=Upverter, ComponentLink6URL=https://datasheet.octopart.com:443/ABS07-32.768KHZ-T-Abracon-datasheet-121082.pdf?src-supplier=Upverter, ComponentLink7Description=https://datasheet.octopart.com:443/ABS07-32.768KHZ-T-Abracon-datasheet-41191559.pdf?src-supplier=element14+APAC, ComponentLink7URL=https://datasheet.octopart.com:443/ABS07-32.768KHZ-T-Abracon-datasheet-41191559.pdf?src-supplier=element14+APAC, ComponentLink8Description=https://datasheet.octopart.com:443/ABS07-32.768KHZ-T-Abracon-datasheet-15206620.pdf?src-supplier=Newark, ComponentLink8URL=https://datasheet.octopart.com:443/ABS07-32.768KHZ-T-Abracon-datasheet-15206620.pdf?src-supplier=Newark, ComponentLink9Description=https://datasheet.octopart.com:443/ABS07-32.768KHZ-T-Abracon-datasheet-37124839.pdf?src-supplier=Farnell, ComponentLink9URL=https://datasheet.octopart.com:443/ABS07-32.768KHZ-T-Abracon-datasheet-37124839.pdf?src-supplier=Farnell, ComponentLink10Description=https://datasheet.octopart.com:443/ABS07-32.768KHZ-T-Abracon-datasheet-128558976.pdf?src-supplier=X-ON, ComponentLink10URL=https://datasheet.octopart.com:443/ABS07-32.768KHZ-T-Abracon-datasheet-128558976.pdf?src-supplier=X-ON, ComponentLink11Description=https://datasheet.octopart.com:443/ABS07-32.768KHZ-T-Abracon-datasheet-49826663.pdf?src-supplier=TME, ComponentLink11URL=https://datasheet.octopart.com:443/ABS07-32.768KHZ-T-Abracon-datasheet-49826663.pdf?src-supplier=TME, ComponentLink12Description=https://datasheet.octopart.com:443/ABS07-32.768KHZ-T-Abracon-datasheet-15994676.pdf?src-supplier=TME, ComponentLink12URL=https://datasheet.octopart.com:443/ABS07-32.768KHZ-T-Abracon-datasheet-15994676.pdf?src-supplier=TME, ComponentLink13Description=http://sigma.octopart.com:80/conflict_mineral_statement/Abracon-company-27.pdf?src-supplier=Compliance+Statements, ComponentLink13URL=http://sigma.octopart.com:80/conflict_mineral_statement/Abracon-company-27.pdf?src-supplier=Compliance+Statements, Country of Origin="Mainland China", Depth=1.5mm, ESR=70kΩ, Export Control Classification Number (ECCN) Code=EAR99, Harmonized Tariff Schedule (HTS) Code=8541.60.00.10, Height=0.9mm, Introduction Date=2007-01-08, Lead Free="Lead Free", Length=3.2mm, Lifecycle Status=Production, Manufacturer Part Number=ABS07-32.768KHZ-T, Mounting Technology="Surface Mount", Number of Pins=2, Packaging="Tape and Reel", Pins=2, Pricing="3000=0,3724, 6000=0,357, 9000=0,3483, 15000=0,3376, 21000=0,3308, 30000=0,3237 (USD)", Radiation Hardening=No, REACH SVHC="No SVHC", RoHS=Compliant, RoHS Compliant=Yes, Schedule B="8541600025, 8541600025|8541600025, 8541600025|8541600025|8541600025, 8541600025|8541600025|8541600025|8541600025", Series=ABS07, Series Resistance=70kR, Stock=717000, Supplier="Arrow Electronics", Supplier 1=DigiKey, Supplier 2=DigiKey, Supplier 3=Mouser, Supplier Part Number=ABS07-32.768KHZ-T, Supplier Part Number 2=535-9542-1-ND, Supplier Part Number 3=815-ABS07-32.768KHZT, Termination=SMD/SMT, Tolerance=20ppm, Width=1.5mm

## Nets (pads, with @x,y where several pads share a name; then routed paths per layer and width w, separated by ;. In a path a pad name is that pad's centre, name@x,y a point inside that pad or via, vN(x,y) a via of type N, cw(c..) or ccw(c..) an arc to the next point about the centre after c; other vN are vias at no path point)
+3V3: C3.1 C7.1 C8.1 C10.1 C11.1 C16.1 C17.1 D2.2 J3.1 J6.1 J7.1 L1.2 PS1.6 R3.1 R6.2 R8.2 R9.2 R11.2 R15.1 U2.2 U3.3 U3.28 U4.20
BNO_INT: U2.9 U3.14
BNO_NRST: U2.8 U3.11
BNO_SCL: R8.1 U2.23 U3.19
BNO_SDA: R9.1 U2.31 U3.20
ENC1_A: J6.2 U2.19
ENC1_B: J6.4 U2.20
ENC2_A: J7.2 U2.21
ENC2_B: J7.4 U2.22
GND: C1.2 C2.2 C3.2 C4.2 C5.2 C6.2 C7.2 C8.2 C10.2 C11.2 C12.2 C14.2 C15.2 C16.2 C17.2 C18.2 C19.2 C20.2 C21.2 C22.2 J1.B1_A12 J1.SH1 J1.SH2 J1.SH3 J1.SH4 J2.2 J3.5 J6.3 J7.3 PS1.1 PS1.4 PS1.5 R1.1 R2.1 R4.2 R5.2 R10.2 R12.2 R16.2 SW2.3 SW2.4 SW3.3 SW3.4 U1.2 U2.1 U2.40 U2.41_1 U2.41_2 U2.41_3 U2.41_4 U2.41_5 U2.41_6 U2.41_7 U2.41_8 U2.41_9 U3.2 U3.5 U3.6 U3.10 U3.25 U4.3 U4.4 U4.9 U4.10 U4.18
HB_IN1_A: U2.5 U4.21
HB_IN1_B: U2.12 U4.17
HB_IN2_A: U2.6 U4.22
HB_IN2_B: U2.17 U4.16
HB_PWM_A: U2.7 U4.23
HB_PWM_B: U2.18 U4.15
HB_STBY: U2.4 U4.19
MA_1: C9.1 J4.1 U4.1 U4.2
MA_2: C9.2 J4.2 U4.5 U4.6
MB_1: C13.1 J5.1 U4.11 U4.12
MB_2: C13.2 J5.2 U4.7 U4.8
MCU_BOOT: C6.1 J3.6 R11.1 SW3.1 SW3.2 U2.27
MCU_RST: C4.1 C5.1 J3.3 R6.1 SW2.1 SW2.2 U2.3
MCU_RX: J3.4 U2.36
MCU_TX: J3.2 R7.1
NetC12_1: C12.1 U3.9
NetC14_1: C14.1 U3.27 Y1.1
NetC15_1: C15.1 U3.26 Y1.2
NetD1_1: D1.1 R4.1
NetD2_1: D2.1 R5.1
NetD3_1: D3.1 R10.1
NetD3_2: D3.2 U2.24
NetJ1_A5: J1.A5 R2.2
NetJ1_B5: J1.B5 R1.2
NetL1_1: L1.1 PS1.7
NetPS1_8: PS1.8 R3.2
NetR7_2: R7.2 U2.37
NetR12_1: R12.1 U2.16
NetR15_2: R15.2 U3.4
NetR16_1: R16.1 U3.17
USB_C_N: J1.A7 J1.B7 U1.4
USB_C_P: J1.A6 J1.B6 U1.6
usb_io_N: R13.2 U2.13
usb_io_P: R14.2 U2.14
USB_MCU_N: R13.1 U1.3
USB_MCU_P: R14.1 U1.1
VBAT: C18.1 C19.1 C20.1 C21.1 D1.2 J2.1 SW1.3 U4.13 U4.14 U4.24
VBUS: C1.1 C22.1 J1.A4_B9 J1.B4_A9 SW1.1 U1.5
VSEL: C2.1 PS1.2 PS1.3 SW1.2
pads on no net: J1. J1.A1_B12 J1.A8 J1.B8 PS1.9 PS1.10 PS1.11 U2.10 U2.11 U2.15 U2.25 U2.26 U2.28 U2.29 U2.30 U2.32 U2.33 U2.34 U2.35 U2.38 U2.39 U2.41_10 U2.41_11 U2.41_12 U2.41_13 U2.41_14 U2.41_15 U2.41_16 U2.41_17 U2.41_18 U2.41_19 U2.41_20 U2.41_21 U3.1 U3.7 U3.8 U3.12 U3.13 U3.15 U3.16 U3.18 U3.21 U3.22 U3.23 U3.24

## Silkscreen, mask and mechanical layers (free items; w line width, h text height)
Mechanical 1:
  the board outline again, w0.254

## Text inside footprints (layer, text, board x,y; h text height)
PCB1: Top Overlay "Rev." at 7.763,61.087 h1.7 r270
U2: Mechanical 13 "ANTENNA" at 30.539,61.644 h1.27